# Altium PCB Michelin PCB BOARD.PcbDoc
Units mm, origin at the board's own origin, x right, y up, seen from the top; angles counter-clockwise.
Board outline 72.17 x 91.6 mm, 2 copper layers (Top Layer, Bottom Layer); 8 components, 11 nets, 99 pads, 0 vias.
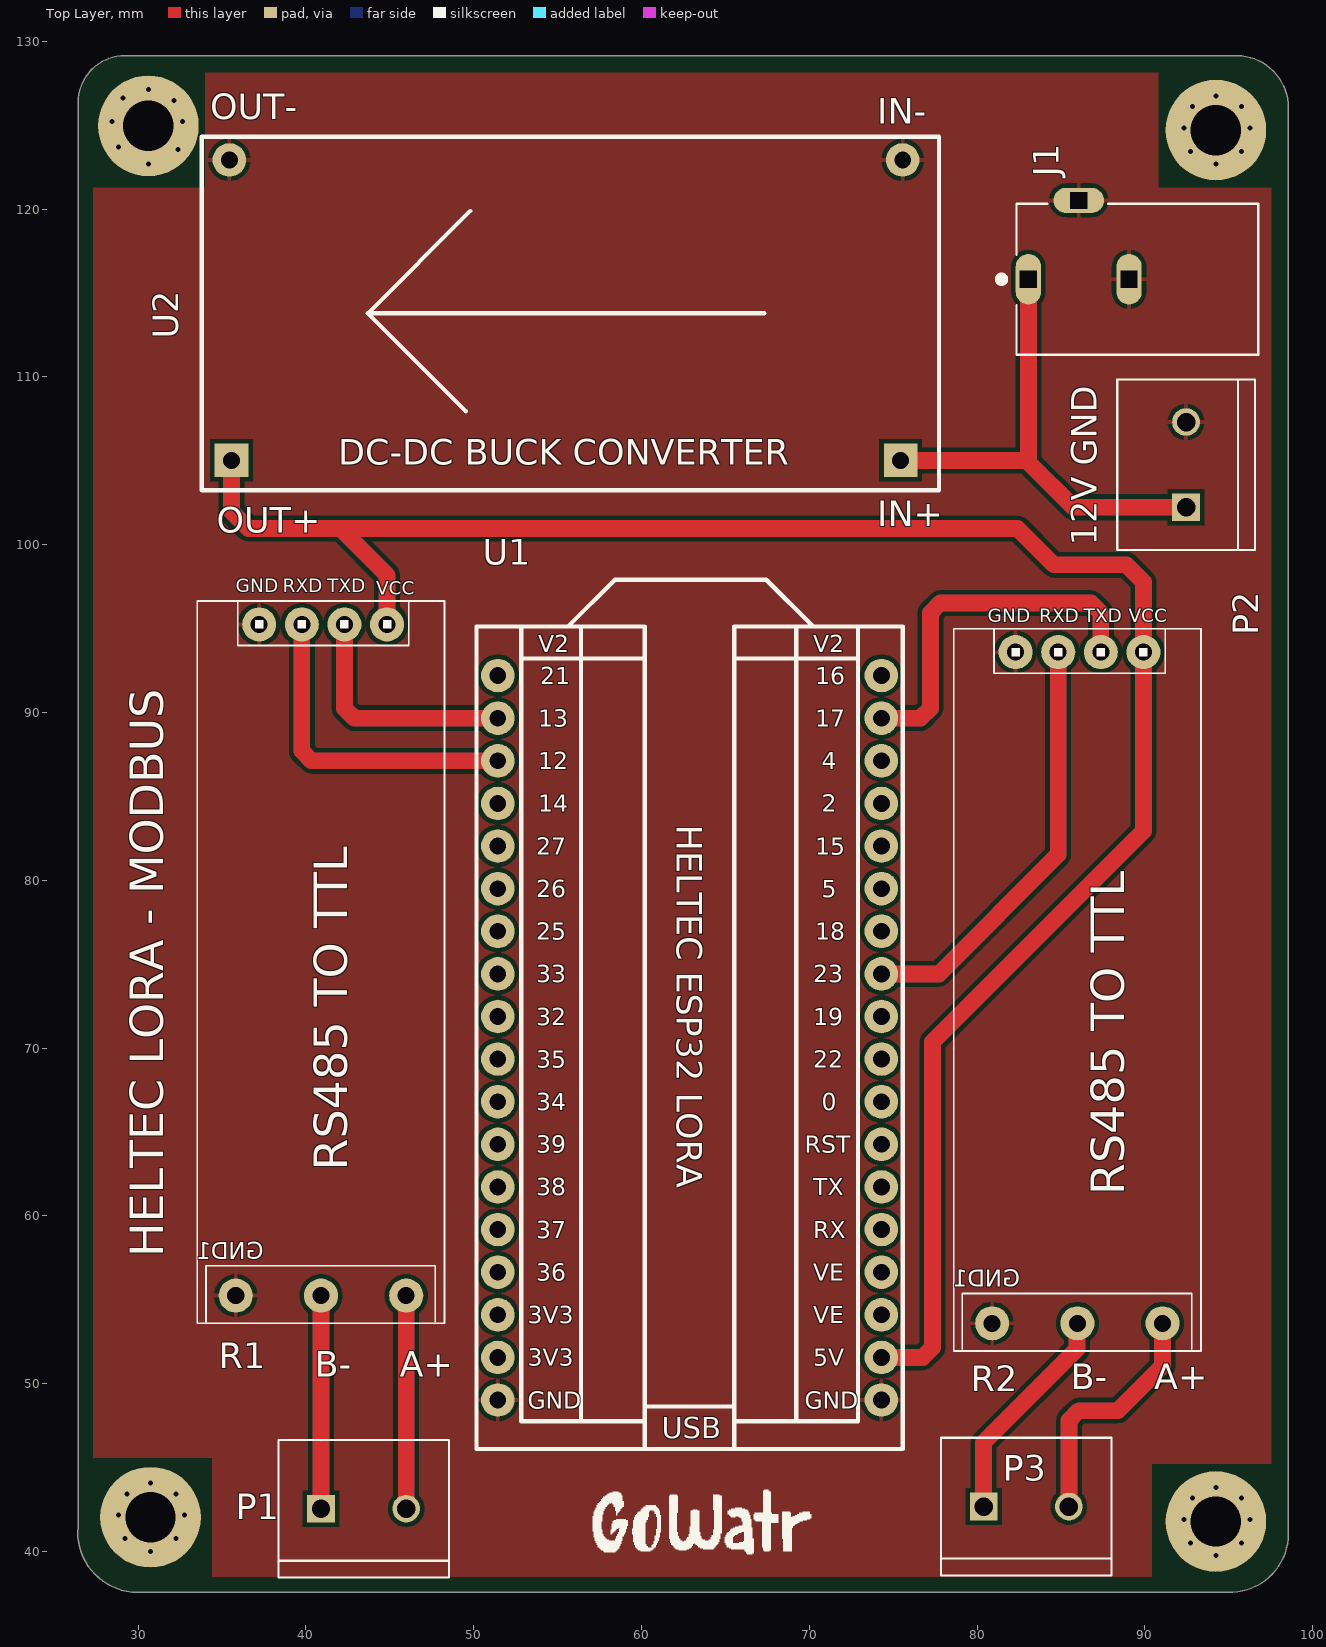
[diagram p0: Top Layer view]
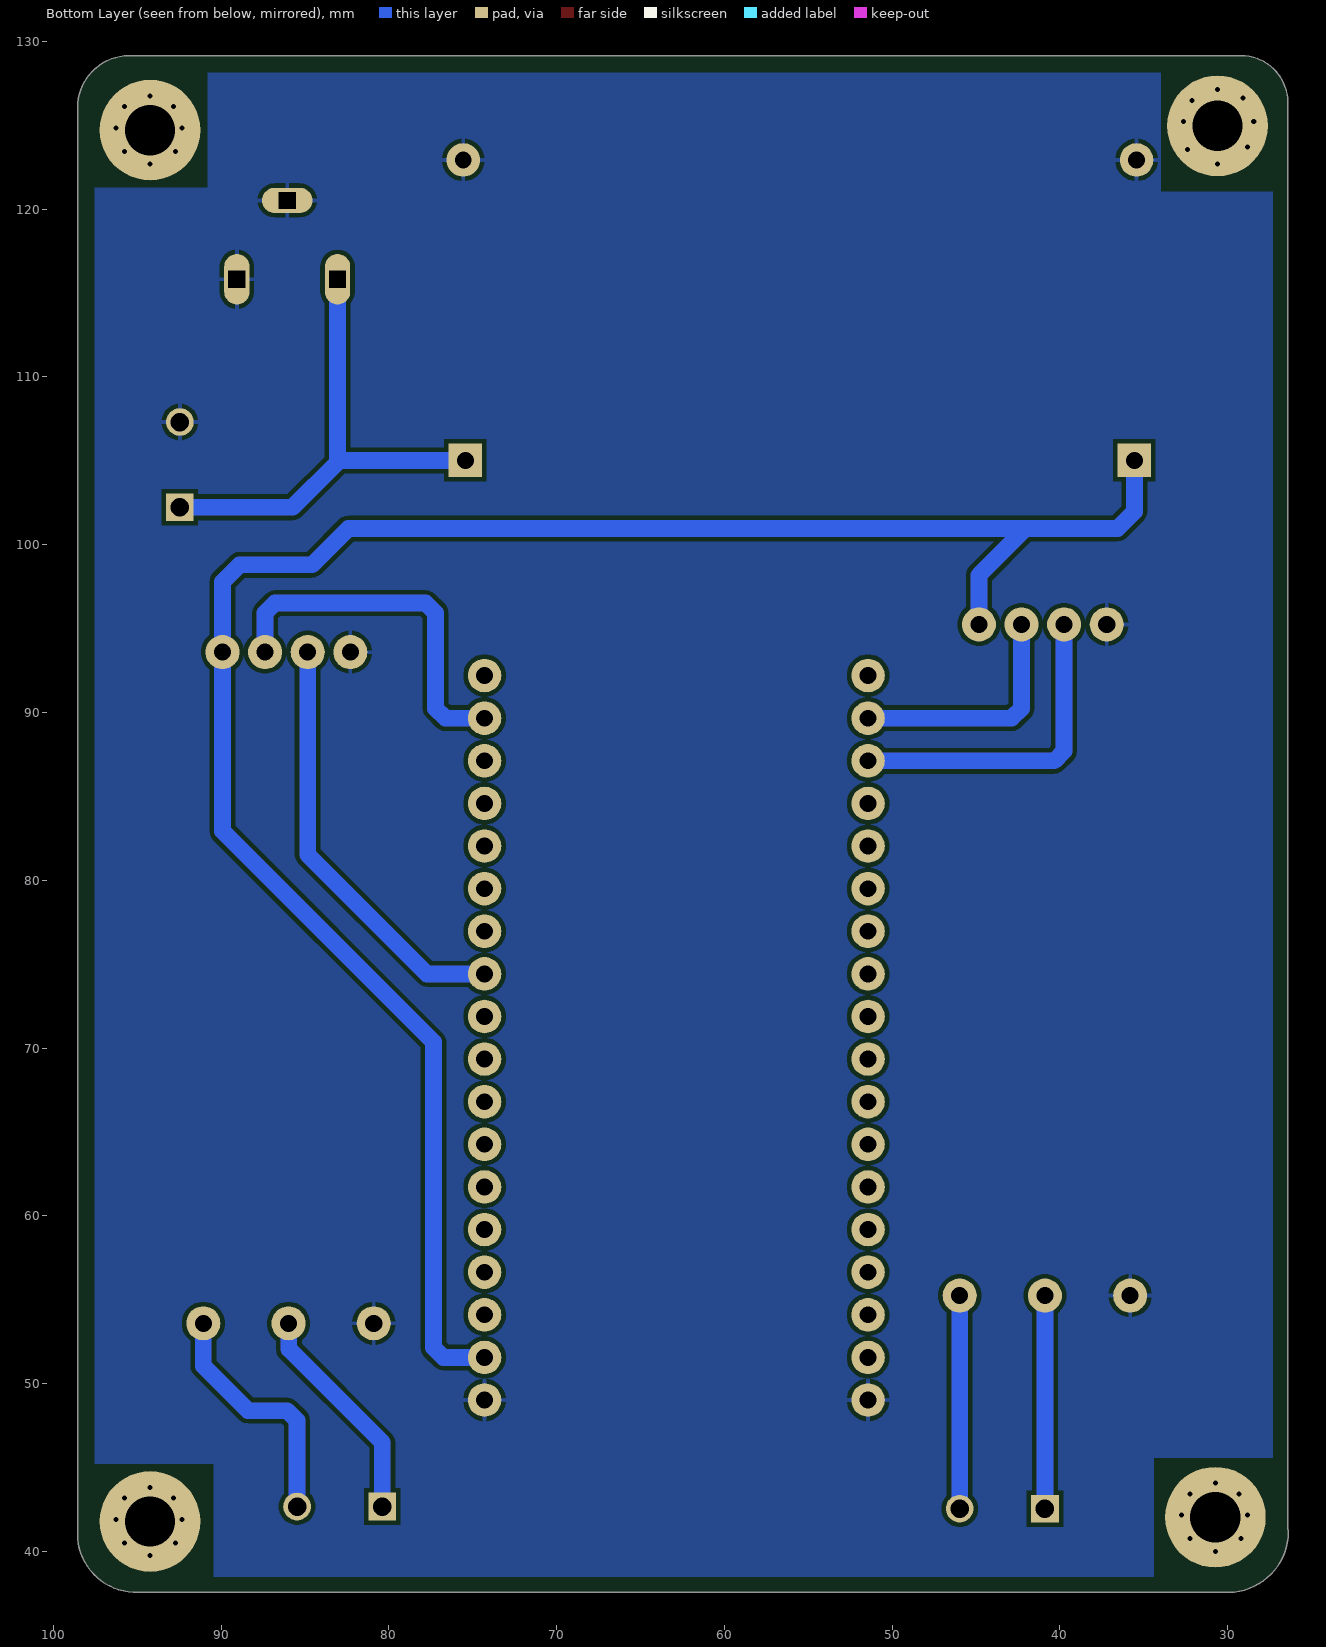
[diagram p1: Bottom Layer view, seen from below]
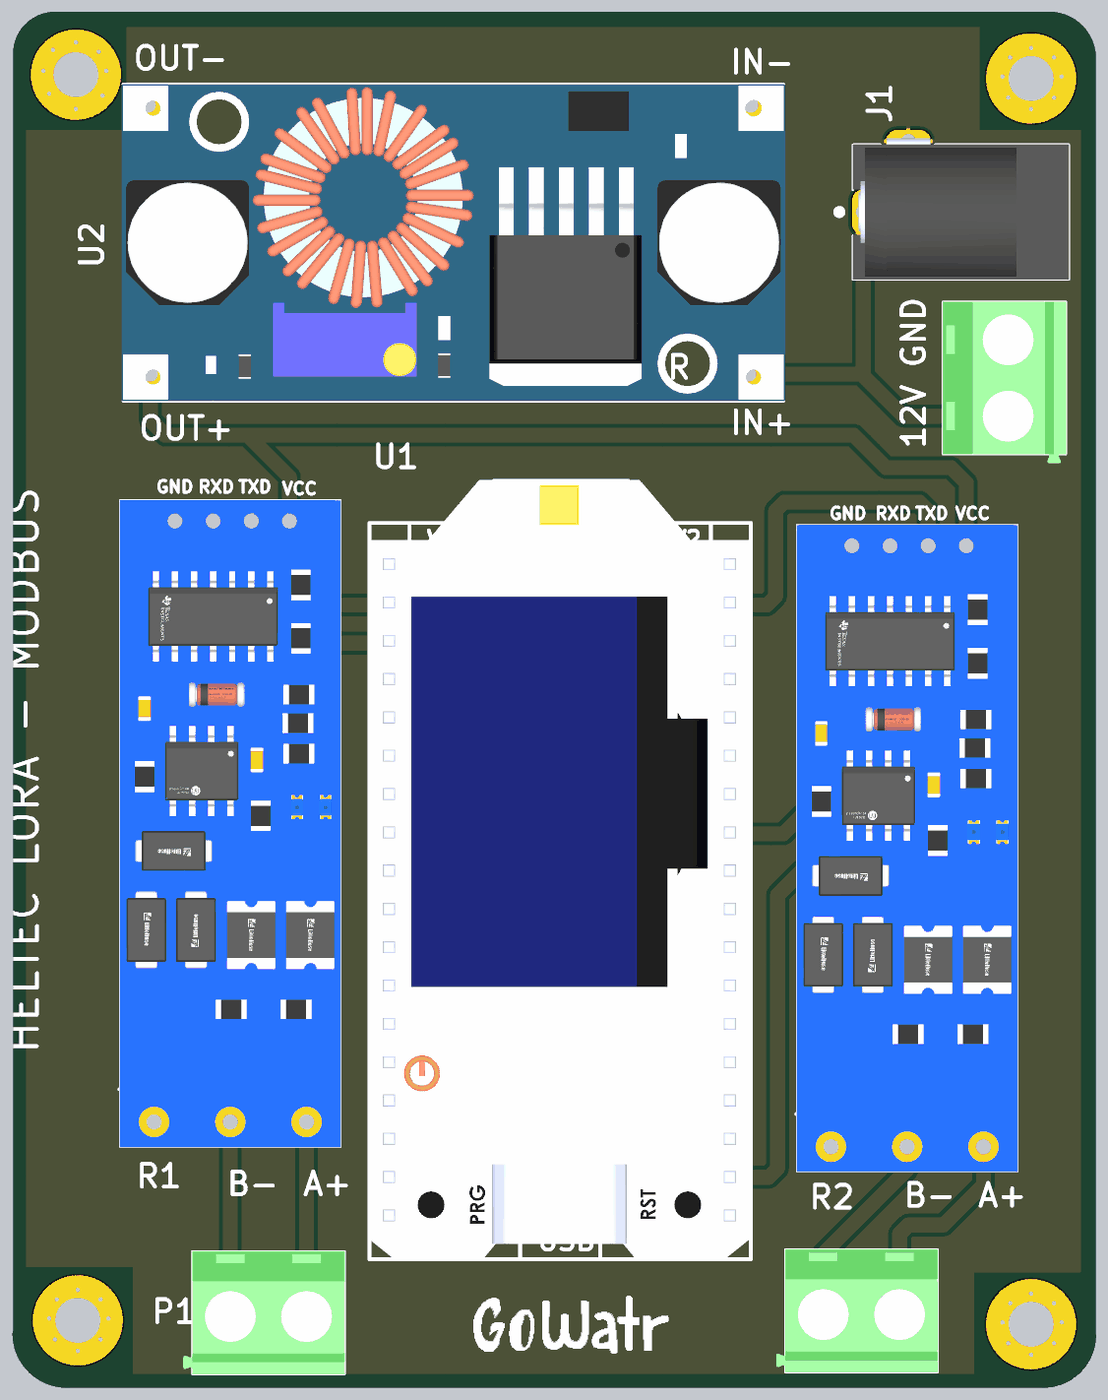
[diagram p2: 3D render of the assembled board from above, using the file's embedded part models]

## Layer stack, top to bottom
Top Solder: solder mask 0.0102, Solder Resist, Dk 3.5
Top Layer: signal copper 0.0356
Dielectric 1: dielectric 0.32, FR-4, Dk 4.8
Bottom Layer: signal copper 0.0356
Bottom Solder: solder mask 0.0102, Solder Resist, Dk 3.5

## Board outline
26.386,41.144 cw(c26.886,41.148) 26.427,41.346 26.424,41.402 26.424,126.373 cw(c29.201,126.374) 29.2,129.151 95.232,129.151 cw(c95.441,126.048) 98.551,126.048 cw(c95.441,126.048) 98.544,125.84 98.544,41.302 cw(c95.063,41.047) 98.554,41.047 cw(c95.063,41.047) 94.946,37.558 30.268,37.558 30.224,37.559 cw(c30.003,41.17)

## Design rules (kind name [scope] priority, off if disabled: settings)
Clearance [All] p1: gap=0.254 ignorepadtopadclearanceinfootprint=FALSE
HoleSize [All] p1: absolutevalues=TRUE maxlimit=5 minlimit=0.025 maxpercent=80.000 minpercent=20.000
MinimumSolderMaskSliver [All] p1: minsoldermaskwidth=0.1
PolygonConnect [All] p1: connectstyle=Relief reliefconductorwidth=0.254 reliefentries=4 polygonreliefangle="90 Angle" airgapwidth=0.254
RoutingVias [All] p1: holewidth=0.711 width=1.27 viastyle="Through Hole" minholewidth=0.711 minwidth=1.27 maxholewidth=0.711 maxwidth=1.27
SilkToSilkClearance [All] p1: silktosilkclearance=0.1
SilkToSolderMaskClearance [IsPad] p1: minsilkscreentomaskgap=0.1 clearancetoexposedcopper=TRUE
SolderMaskExpansion [All] p1: expansion=0.102 istentingtop=FALSE
Width [All] p1: maxlimit=1.27 minlimit=0.254 preferedwidth=0.762
26 further rules are at their usual default settings.

## Components (designator, comment, footprint, x,y, rotation, side; value= is the part's Value field where it differs from the comment)
J1 "PJ-102A" CUI_PJ-102A 89.558,115.824 r0 top
P1 "282837-2" TE_282837-2 43.434,42.545 r0 top
P2 "282837-2" TE_282837-2 92.456,104.775 r90 top
P3 "282837-2" TE_282837-2 82.931,42.672 r0 top
R1 "RS485 TO TTL" "RS485 TO TTL" 33.528,96.647 r270 top
R2 "RS485 TO TTL" "RS485 TO TTL" 78.613,94.996 r270 top
U1 "HELTEC_LORA_32_V2" HELTEC_LORA_32_V2_V3 62.865,70.612 r0 top locked
U2 "MODULE_LM2596" MODULE_XL4005 55.499,113.983 r180 top

## Footprints (in the part's own frame and the unit in brackets; to place one, negate y for a bottom-side part, rotate by r counter-clockwise, add the part's x,y. Pads: shape width x height; smd on the part's side, far side on the other; paste and mask are expansions set on the pad)
CUI_PJ-102A [mm]
  oval 1.508x3.016 hole 1 square: 1(-6.5,0) 2(-0.5,0)
  oval 3.016x1.508 hole 1 square: 3(-3.5,4.7)
  silkscreen extent -8.3,-4.5 7.2,4.5, body extent -7.2,-4.5 7.2,4.9, height 11
HELTEC_LORA_32_V2_V3 [mm] "Heltec Lora 32 36 Pins"
  round 2 hole 1: 1(11.43,-21.59) 2(11.43,-19.05) 3(11.43,-16.51) 4(11.43,-13.97) 5(11.43,-11.43) 6(11.43,-8.89) 7(11.43,-6.35) 8(11.43,-3.81) 9(11.43,-1.27) 10(11.43,1.27) 11(11.43,3.81) 12(11.43,6.35) 13(11.43,8.89) 14(11.43,11.43) 15(11.43,13.97) 16(11.43,16.51) 17(11.43,19.05) 18(11.43,21.59) 19(-11.43,21.59) 20(-11.43,19.05) 21(-11.43,16.51) 22(-11.43,13.97) 23(-11.43,11.43) 24(-11.43,8.89) 25(-11.43,6.35) 26(-11.43,3.81) 27(-11.43,1.27) 28(-11.43,-1.27) 29(-11.43,-3.81) 30(-11.43,-6.35) 31(-11.43,-8.89) 32(-11.43,-11.43) 33(-11.43,-13.97) 34(-11.43,-16.51) 35(-11.43,-19.05) 36(-11.43,-21.59)
  silkscreen extent -12.7,-24.51 12.7,27.3, body extent -12.7,-24.38 12.6,27.37, height 9.81
MODULE_XL4005 [mm] "MODULE BUCK STEP DOWN 5A 44x21mm"
  round 2 hole 1: 1(20.066,-8.953) 4(-20.066,-8.954)
  rect 2x2 hole 1: 2(19.939,8.954) 3(-19.939,8.953)
  silkscreen extent -22.22,-10.34 21.72,10.73, body extent -22.35,-10.35 21.85,10.75, height 13.15
"RS485 TO TTL" [mil]
  round 80 hole 40: A+(1630,490) B-(1630,290) GND(55,145) GND1(1630,90) RXD(55,245) TXD(55,345) VCC(55,445)
  silkscreen extent 0,0 1695,580, body extent 0,0 1695,580, height 130
TE_282837-2 [mm]
  rect 1.65x1.65 / inner round 1.65 / far side rect 1.65x1.65 hole 1.1: 1(-2.54,0)
  round 1.65 hole 1.1: 2(2.54,0)
  silkscreen extent -5.08,-4.1 5.08,4.1, body extent -5.68,-4.1 5.08,4.1, height 10

## Part data
J1: "2.0 x 6.5 mm, 2.5 A, Horizontal, Through Hole, Tapered Pins, Dc Power Jack Connector", Package=None, Availability="In Stock", Check_prices=https://www.snapeda.com/parts/PJ-102A/CUI+Devices/view-part/?ref=eda, CUI_purchase_URL=https://www.cuidevices.com/product/interconnect/connectors/dc-power-connectors/jacks/pj-102a?utm_source=snapeda.com&utm_medium=referral&utm_campaign=snapedaBOM, MF="CUI Devices", MP=PJ-102A, Price=None, Purchase-URL=https://pricing.snapeda.com/search/part/PJ-102A/?ref=eda, SnapEDA_Link=https://www.snapeda.com/parts/PJ-102A/CUI+Devices/view-part/?ref=snap
P1 P2 P3: "Ð Ð°Ð·ÑŠÐµÐ¼Ð½Ñ‹Ðµ ÐºÐ»ÐµÐ¼Ð¼Ð½Ñ‹Ðµ ÐºÐ¾Ð»Ð¾Ð´ÐºÐ¸ Ð Ð¾Ð·ÐµÑ‚ÐºÐ° 2 Ð¿Ð¾Ð»Ð¾Ð¶ÐµÐ½Ð¸Ñ 5,08 Ð¼Ð¼ ÐŸÑ€Ð¸Ð¿Ð¾Ð¹ Ð¿Ñ€ÑÐ¼Ð¾Ð¹ Ñ‡ÐµÑ€ÐµÐ· Ð¾Ñ‚Ð²ÐµÑ€ÑÑ‚Ð¸Ðµ 13,5 Ð / ÐºÐ¾Ð½Ñ‚Ð°ÐºÑ‚", Package=None, Availability="In Stock", Check_prices=https://www.snapeda.com/parts/282837-2/TE+Connectivity+AMP+Connectors/view-part/?ref=eda, MF="TE Connectivity", MP=282837-2, Price=None, Purchase-URL=https://pricing.snapeda.com/search/part/282837-2/?ref=eda, SnapEDA_Link=https://www.snapeda.com/parts/282837-2/TE+Connectivity+AMP+Connectors/view-part/?ref=snap
U1: "Heltec Lora 32 V2, 36 Pins."
U2: library part MODULE_XL4005, "MODULE BUCK STEP DOWN 5A 44x21mm", ComponentLink1Description=Datasheet, ComponentLink1URL=https://www.laskakit.cz/user/related_files/xl4005_datasheet.pdf

## Free pads (board coordinates)
  round 6 hole 3: 2(30.607,124.968) 2(30.734,42.037) 2(94.234,41.783) 2(94.234,124.714)
  round 0.524 hole 0.3: 3(28.448,125.222) 3(28.829,42.164) 3(28.829,123.698) 3(29.083,126.619) 3(29.21,40.767) 3(29.337,43.434) 3(30.607,122.682) 3(30.607,127.127) 3(30.734,40.005) 3(30.734,44.069) 3(32.131,126.492) 3(32.258,40.767) 3(32.258,43.434) 3(32.385,123.571) 3(32.639,125.222) 3(32.766,42.164) 3(92.329,41.91) 3(92.329,124.841) 3(92.71,40.513) 3(92.71,123.444) 3(92.837,43.18) 3(92.837,126.111) 3(94.234,39.751) 3(94.234,43.815) 3(94.234,122.682) 3(94.234,126.746) 3(95.758,40.513) 3(95.758,43.18) 3(95.758,123.444) 3(95.758,126.111) 3(96.266,41.91) 3(96.266,124.841)

## Nets (pads, with @x,y where several pads share a name; then routed paths per layer and width w, separated by ;. In a path a pad name is that pad's centre, name@x,y a point inside that pad or via, vN(x,y) a via of type N, cw(c..) or ccw(c..) an arc to the next point about the centre after c; other vN are vias at no path point)
5V: R1.VCC R2.VCC U1.2 U2.2 | length 239.4
  Top Layer w1: U2.2 35.56,101.981 36.572,100.969 42.045,100.969 42.049,100.965 ; R1.VCC 44.831,98.183 42.049,100.965 ; U1.2 76.757,51.562 77.343,52.148 77.343,70.358 89.916,82.931 R2.VCC 89.916,97.79 88.9,98.806 84.582,98.806 82.419,100.969 68.076,100.969 68.072,100.965 42.049,100.965
  Bottom Layer w1: U2.2 35.56,101.981 36.572,100.969 42.045,100.969 ; R1.VCC 44.831,98.183 42.045,100.969 ; U1.2 76.757,51.562 77.343,52.148 77.343,70.358 89.916,82.931 R2.VCC@89.916,92.71 ; R2.VCC 89.916,97.79 88.9,98.806 84.582,98.806 82.419,100.969 42.045,100.969
GND: J1.2 J1.3 P2.2 R1.GND R1.GND1 R2.GND R2.GND1 U1.1 U1.36 U2.1 U2.4
NetP1_1: P1.1 R1.B- | length 25.3
  Top Layer w1: P1.1 R1.B-
  Bottom Layer w1: P1.1@40.894,42.672 R1.B-
NetP1_2: P1.2 R1.A+ | length 25.3
  Top Layer w1: P1.2 R1.A+
  Bottom Layer w1: P1.2@45.974,42.672 R1.A+
NetP3_1: P3.1 R2.B- | length 26.5
  Top Layer w1: P3.1 80.391,46.482 85.962,52.053 85.962,53.577 R2.B-
  Bottom Layer w1: P3.1 80.391,46.482 85.962,52.053 85.962,53.577 R2.B-
NetP3_2: P3.2 R2.A+ | length 29.2
  Top Layer w1: P3.2 85.471,47.801 86.057,48.387 88.392,48.387 91.059,51.054 R2.A+
  Bottom Layer w1: P3.2 85.471,47.801 86.057,48.387 88.392,48.387 91.059,51.054 R2.A+
RX1: R1.RXD U1.21 | length 38.9
  Top Layer w1: R1.RXD 39.751,87.708 40.337,87.122 U1.21
  Bottom Layer w1: R1.RXD 39.751,87.708 40.337,87.122 U1.21
RX2: R2.RXD U1.11 | length 51.1
  Top Layer w1: U1.11 77.724,74.422 84.836,81.534 R2.RXD
  Bottom Layer w1: U1.11 77.724,74.422 84.836,81.534 R2.RXD
TX1: R1.TXD U1.20 | length 28.9
  Top Layer w1: R1.TXD 42.291,90.248 42.877,89.662 U1.20
  Bottom Layer w1: R1.TXD 42.291,90.248 42.877,89.662 U1.20 U1.20@51.562,89.662
TX2: R2.TXD U1.17 | length 43.7
  Top Layer w1: U1.17 76.63,89.662 77.216,90.248 77.216,95.934 77.802,96.52 86.79,96.52 87.376,95.934 R2.TXD
  Bottom Layer w1: U1.17 76.63,89.662 77.216,90.248 77.216,95.934 77.802,96.52 86.79,96.52 87.376,95.934 R2.TXD
VINN: J1.1 P2.1 U2.3 | length 58.9
  Top Layer w1: U2.3 82.94,105.029 83.058,104.911 ; J1.1 83.058,104.911 ; P2.1 85.734,102.235 83.058,104.911
  Bottom Layer w1: U2.3 82.94,105.029 83.058,104.911 ; J1.1@83.058,116.586 J1.1 83.058,104.911 ; P2.1 85.734,102.235 83.058,104.911
pads on no net: U1.3 U1.4 U1.5 U1.6 U1.7 U1.8 U1.9 U1.10 U1.12 U1.13 U1.14 U1.15 U1.16 U1.18 U1.19 U1.22 U1.23 U1.24 U1.25 U1.26 U1.27 U1.28 U1.29 U1.30 U1.31 U1.32 U1.33 U1.34 U1.35

## Polygon pours and split planes (outlines as drawn)
GND on Top Layer "GND_L01_P001" (solid, remove dead copper, pour order 1): 90.805,121.285 97.536,121.285 97.536,45.212 90.424,45.212 90.424,38.481 34.417,38.481 34.417,45.593 27.305,45.593 27.305,121.285 33.988,121.285 33.988,128.143 90.805,128.143
GND on Bottom Layer "GND_L02_P000" (solid, remove dead copper, pour order 0): 97.536,121.285 97.536,45.212 90.424,45.212 90.424,38.481 34.417,38.481 34.417,45.593 27.305,45.593 27.305,121.031 33.988,121.031 33.988,128.143 90.805,128.143 90.805,121.285

## Silkscreen, mask and mechanical layers (free items; w line width, h text height)
Top Overlay:
  drawing of 6 lines, arcs and shapes, not listed
  text "12V GND" at 87.122,99.949 h1.52 r90
  text "HELTEC LORA - MODBUS" at 31.496,57.531 h2 r90
Mechanical 1:
  lines w1: 26.886,41.148 ccw(c30.003,41.17) 30.194,38.058 ; 26.924,41.402 26.924,126.373 cw(c29.121,126.476) 29.464,128.649 ; 29.2,128.651 95.631,128.651 ; 30.268,38.058 94.954,38.058 ccw(c95.063,41.047) 98.044,41.283 ; 95.25,128.651 cw(c95.441,126.048) 98.045,125.857 ; 98.044,41.148 98.044,126.238

## Text inside footprints (layer, text, board x,y; h text height)
R1: Top Overlay "VCC" at 44.196,97.028 h0.8; Top Overlay "RXD" at 38.608,97.155 h0.8; Top Overlay "TXD" at 41.275,97.155 h0.8; Top Overlay "GND" at 35.814,97.155 h0.8; Top Overlay "B-" at 40.513,50.419 h1.52; Top Overlay "GND1" at 37.484,57.411 h1; Top Overlay "A+" at 45.593,50.419 h1.52
R2: Top Overlay "VCC" at 89.027,95.377 h0.8; Top Overlay "RXD" at 83.693,95.377 h0.8; Top Overlay "TXD" at 86.36,95.377 h0.8; Top Overlay "GND" at 80.645,95.377 h0.8; Top Overlay "B-" at 85.598,49.657 h1.52; Top Overlay "GND1" at 82.569,55.76 h1; Top Overlay "A+" at 90.551,49.657 h1.52
U1: Top Overlay "13" at 53.848,89.154 h1.02; Top Overlay "HELTEC ESP32 LORA" at 62.103,83.312 h1.52 r270; Top Overlay "38" at 53.721,61.214 h1.02; Top Overlay "39" at 53.721,63.754 h1.02; Top Overlay "34" at 53.721,66.294 h1.02; Top Overlay "35" at 53.721,68.834 h1.02; Top Overlay "32" at 53.721,71.374 h1.02; Top Overlay "33" at 53.721,73.914 h1.02; Top Overlay "25" at 53.721,76.454 h1.02; Top Overlay "26" at 53.721,78.994 h1.02; Top Overlay "27" at 53.721,81.534 h1.02; Top Overlay "14" at 53.848,84.074 h1.02; Top Overlay "12" at 53.848,86.614 h1.02; Top Overlay "36" at 53.721,56.134 h1.02; Top Overlay "37" at 53.721,58.674 h1.02; Top Overlay "21" at 53.975,91.694 h1.02; Top Overlay "RST" at 69.723,63.754 h1.02; Top Overlay "0" at 70.739,66.294 h1.02; Top Overlay "22" at 70.231,68.834 h1.02; Top Overlay "19" at 70.231,71.374 h1.02; Top Overlay "23" at 70.231,73.914 h1.02; Top Overlay "18" at 70.358,76.454 h1.02; Top Overlay "5" at 70.739,78.994 h1.02; Top Overlay "15" at 70.358,81.534 h1.02; Top Overlay "2" at 70.739,84.074 h1.02; Top Overlay "4" at 70.739,86.614 h1.02; Top Overlay "17" at 70.358,89.154 h1.02; Top Overlay "16" at 70.358,91.694 h1.02; Top Overlay "VE" at 70.231,53.594 h1.02; Top Overlay "VE" at 70.231,56.134 h1.02; Top Overlay "RX" at 70.231,58.674 h1.02; Top Overlay "TX" at 70.231,61.214 h1.02; Top Overlay "GND" at 69.723,48.514 h1.02; Top Overlay "3V3" at 53.213,51.054 h1.02; Top Overlay "3V3" at 53.213,53.594 h1.02; Top Overlay "GND" at 53.213,48.514 h1.02; Top Overlay "V2" at 53.848,93.599 h1.02; Top Overlay "V2" at 70.231,93.599 h1.02; Top Overlay "USB" at 61.214,46.736 h1.27; Top Overlay "5V" at 70.231,51.054 h1.02
U2: Top Overlay "DC-DC BUCK CONVERTER" at 41.91,104.775 h1.52; Top Overlay "OUT+" at 34.671,100.711 h1.52; Top Overlay "IN-" at 74.041,125.095 h1.52; Top Overlay "IN+" at 74.041,101.092 h1.52; Top Overlay "OUT-" at 34.29,125.349 h1.52